# Altium PCB Audio-Switcher-v1.1.PcbDoc (part 2 of 2)
Units mil, origin at the board's own origin, x right, y up, seen from the top; angles counter-clockwise.
Board outline 6000 x 4000 mil, 2 copper layers (Top Layer, Bottom Layer); 150 components, 118 nets, 462 pads, 0 vias.
Unrouted connection lines stored in the file: 298.
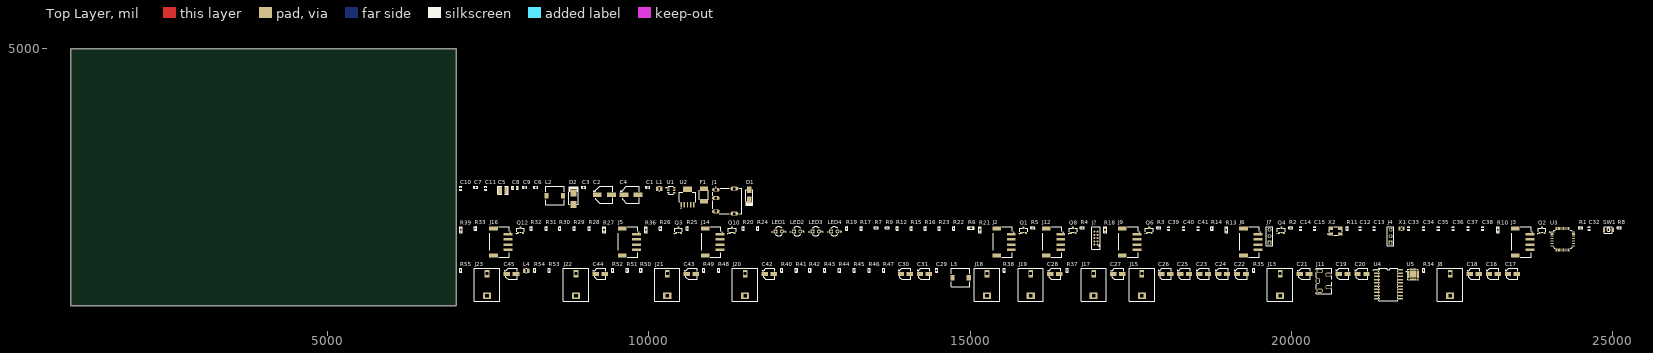
[diagram p0: Top Layer view]

## Part data (continued)
R8 R11 R14 R19 R24 R26 R28 R29 R30 R31 R33: library part RC0402FR-0710KL, "RES 10K OHM 1% 1/16W 0402", Case Code (Imperial)=0402, Case Code (Metric)=1005, LCSC Part Number=C60490, Manufacturer=Yageo, Max Operating Temperature=155°C, Max Power Dissipation=63mW, Min Operating Temperature=-55°C, Power Rating=62.5mW, Resistance=10kR, Resistance Tolerance=1%, Resistor Type="Thick Film", Supplier Part Number 1=603-RC0402FR-0710KL, Temperature Coefficient=100ppm/°C, Voltage Rating=50V, Case/Package=0402, Category="Chip SMD Resistors", ComponentLink1Description=https://datasheet.ciiva.com/7660/38568-7660787.pdf?src-supplier=Element14, ComponentLink1URL=https://datasheet.ciiva.com/7660/38568-7660787.pdf?src-supplier=Element14, ComponentLink2Description=https://datasheet.ciiva.com/7849/1686128-7849814.pdf?src-supplier=Element14, ComponentLink2URL=https://datasheet.ciiva.com/7849/1686128-7849814.pdf?src-supplier=Element14, ComponentLink3Description=https://datasheet.ciiva.com/7983/1018594-7983486.pdf?src-supplier=Element14, ComponentLink3URL=https://datasheet.ciiva.com/7983/1018594-7983486.pdf?src-supplier=Element14, ComponentLink4Description=https://datasheet.ciiva.com/22747/1018594-22747512.pdf?src-supplier=Element14, ComponentLink4URL=https://datasheet.ciiva.com/22747/1018594-22747512.pdf?src-supplier=Element14, ComponentLink5Description=https://datasheet.ciiva.com/12667/pyu-rc0402-51-rohs-l-6-r-12667067.pdf?src-supplier=Mouser, ComponentLink5URL=https://datasheet.ciiva.com/12667/pyu-rc0402-51-rohs-l-6-r-12667067.pdf?src-supplier=Mouser, ComponentLink6Description=https://datasheet.ciiva.com/7849/1784430-7849813.pdf?src-supplier=Element14, ComponentLink6URL=https://datasheet.ciiva.com/7849/1784430-7849813.pdf?src-supplier=Element14, ComponentLink7Description=https://datasheet.ciiva.com/7849/1784430-7849815.pdf?src-supplier=Element14, ComponentLink7URL=https://datasheet.ciiva.com/7849/1784430-7849815.pdf?src-supplier=Element14, Construction=Rectangular, Depth=0.5mm, Features="Moisture Resistant", Height=0.32mm, Item Type=Resistor, Lead Free="Lead Free", Lead Pitch=0.2mm, Length=1mm, Manufacturer Part Number=RC0402FR-0710KL, Military Standard=Not, Number of Pins=2, Number of Terminations=2, Packaging="Tape and Reel", Pricing 1="1=0.10000, 10=0.01400, 50=0.01400, 100=0.00500, 1000=0.00300, 10000=0.00200 (USD)", REACH SVHC="No SVHC", RoHS=Yes, RoHS Compliant=Yes, Series=RC, Stock 1=18648329, Supplier 1=Mouser, Termination=SMD/SMT, Tolerance=1%, Voltage Rating (DC)=50V, Width=0.5mm, Working Voltage=50V
R34 R35 R37 R38 R48 R49 R50 R51 R52 R53 R54 R55: library part RC0402FR-071KL, "RES 1K OHM 1% 1/16W 0402", Case Code (Imperial)=0402, Case Code (Metric)=1005, LCSC Part Number=C106235, Manufacturer=Yageo, Max Operating Temperature=155°C, Max Power Dissipation=63mW, Min Operating Temperature=-55°C, Power Rating=62.5mW, Resistance=1kR, Resistance Tolerance=1%, Resistor Type="Thick Film", Temperature Coefficient=100ppm/°C, Voltage Rating=50V, Case/Package=0402, Category="Chip SMD Resistors", ComponentLink1Description=https://datasheet.ciiva.com/11819/0900766b80c66297-11819477.pdf?src-supplier=RSComponents, ComponentLink1URL=https://datasheet.ciiva.com/11819/0900766b80c66297-11819477.pdf?src-supplier=RSComponents, ComponentLink2Description=https://datasheet.ciiva.com/7983/1018594-7983502.pdf?src-supplier=Element14, ComponentLink2URL=https://datasheet.ciiva.com/7983/1018594-7983502.pdf?src-supplier=Element14, ComponentLink3Description=https://datasheet.ciiva.com/22747/1018594-22747513.pdf?src-supplier=Element14, ComponentLink3URL=https://datasheet.ciiva.com/22747/1018594-22747513.pdf?src-supplier=Element14, ComponentLink4Description=https://datasheet.ciiva.com/12666/pyu-rc0402-51-rohs-l-6-r-12666741.pdf?src-supplier=Mouser, ComponentLink4URL=https://datasheet.ciiva.com/12666/pyu-rc0402-51-rohs-l-6-r-12666741.pdf?src-supplier=Mouser, ComponentLink5Description=https://datasheet.ciiva.com/7849/1018594-7849869.pdf?src-supplier=Element14, ComponentLink5URL=https://datasheet.ciiva.com/7849/1018594-7849869.pdf?src-supplier=Element14, ComponentLink6Description=https://datasheet.ciiva.com/7849/1018594-7849871.pdf?src-supplier=Element14, ComponentLink6URL=https://datasheet.ciiva.com/7849/1018594-7849871.pdf?src-supplier=Element14, ComponentLink7Description=https://datasheet.ciiva.com/17063/pyu-rc0402-51-rohs-l-6-r-17063193.pdf?src-supplier=Future+Electronics, ComponentLink7URL=https://datasheet.ciiva.com/17063/pyu-rc0402-51-rohs-l-6-r-17063193.pdf?src-supplier=Future+Electronics, Construction=Rectangular, Depth=0.5mm, Features="Moisture Resistant", Height=0.32mm, Item Type=Resistor, Lead Free="Lead Free", Length=1mm, Manufacturer Part Number=RC0402FR-071KL, Military Standard=Not, Number of Pins=2, Number of Terminations=2, Packaging="Tape and Reel", Pricing 1="10000=0.00085, 20000=0.00087, 40000=0.00084, 60000=0.00083, 80000=0.00079, 100000=0.00078, 1000000=0.00076 (USD)", Reach SVHC Compliant=Yes, RoHS=Yes, RoHS Compliant=Yes, Series=RC, Size Code=0402, Stock 1=13030000, Supplier 1=Avnet, Supplier Part Number 1=RC0402FR-071KL, Technology="THICK FILM", Termination=SMD/SMT, Tolerance=1%, Voltage Rating (DC)=50V, Width=0.5mm
R40 R41 R42 R43 R44 R45 R46 R47: library part RC0402FR-07100KL, "RES 100K OHM 1% 1/16W 0402", Case Code (Imperial)=0402, Case Code (Metric)=1005, LCSC Part Number=C60491, Manufacturer=Yageo, Max Operating Temperature=155°C, Max Power Dissipation=63mW, Min Operating Temperature=-55°C, Package Quantity=1, Resistance=100kR, Resistance Tolerance=1%, Resistor Type="Thick Film", Supplier Part Number 1=603-RC0402FR-07100KL, Temperature Coefficient=100ppm/°C, Voltage Rating=50V, Case/Package=0402, Category="Chip SMD Resistors", ComponentLink1Description=https://datasheet.ciiva.com/11819/0900766b80c66297-11819452.pdf?src-supplier=RSComponents, ComponentLink1URL=https://datasheet.ciiva.com/11819/0900766b80c66297-11819452.pdf?src-supplier=RSComponents, ComponentLink2Description=https://datasheet.ciiva.com/22747/1018594-22747509.pdf?src-supplier=Element14, ComponentLink2URL=https://datasheet.ciiva.com/22747/1018594-22747509.pdf?src-supplier=Element14, ComponentLink3Description=https://datasheet.ciiva.com/2453/pyu-r-int-thick-7-2453362.pdf?src-supplier=Digi-Key, ComponentLink3URL=https://datasheet.ciiva.com/2453/pyu-r-int-thick-7-2453362.pdf?src-supplier=Digi-Key, ComponentLink4Description=https://datasheet.ciiva.com/2453/pyu-r-int-thick-7-2453363.pdf?src-supplier=Digi-Key, ComponentLink4URL=https://datasheet.ciiva.com/2453/pyu-r-int-thick-7-2453363.pdf?src-supplier=Digi-Key, ComponentLink5Description=https://datasheet.ciiva.com/2453/pyu-r-int-thick-7-2453361.pdf?src-supplier=Digi-Key, ComponentLink5URL=https://datasheet.ciiva.com/2453/pyu-r-int-thick-7-2453361.pdf?src-supplier=Digi-Key, ComponentLink6Description=https://datasheet.ciiva.com/12667/pyu-rc0402-51-rohs-l-6-r-12667930.pdf?src-supplier=Mouser, ComponentLink6URL=https://datasheet.ciiva.com/12667/pyu-rc0402-51-rohs-l-6-r-12667930.pdf?src-supplier=Mouser, ComponentLink7Description=https://datasheet.ciiva.com/15189/getdatasheetpartid-323696-15189334.pdf?src-supplier=Verical, ComponentLink7URL=https://datasheet.ciiva.com/15189/getdatasheetpartid-323696-15189334.pdf?src-supplier=Verical, Construction=Rectangular, Depth=0.5mm, Features="Moisture Resistant", Height=0.016inch, Item Type=Resistor, Lead Free="Lead Free", Length=0.039inch, Manufacturer Part Number=RC0402FR-07100KL, Military Standard=Not, Number of Terminations=2, Packaging="Tape and Reel", Power Rating=63mW, Pricing 1="1=0.10000, 10=0.01200, 50=0.01200, 100=0.00500, 1000=0.00300, 2500=0.00200, 10000=0.00100 (USD)", REACH SVHC="No SVHC", RoHS=Yes, RoHS Compliant=Yes, Series=RC, Stock 1=7759549, Supplier 1=Mouser, Technology="THICK FILM", Termination=SMD/SMT, Tolerance=1%, Width=0.02inch, Working Voltage=50V
SW1: "SWITCH TACTILE SPST-NO 0.05A 12V", Contact Current Rating=50mA, Contact Resistance=100mR, Insulation Resistance=100MR, LCSC Part Number=C231329, Manufacturer=Omron, Max Operating Temperature=70°C, Max Voltage Rating (DC)=12V, Min Operating Temperature=-25°C, Operating Force=1.5N, Package Quantity=1, Ratings="Dust Proof,IP40", Supplier Part Number 1=SW1020DKR-ND, Actuator Length=0.4mm, Actuator Type=Standard, ComponentLink1Description=http://www.farnell.com/datasheets/60838.pdf?src-supplier=Farnell, ComponentLink1URL=http://www.farnell.com/datasheets/60838.pdf?src-supplier=Farnell, ComponentLink2Description=http://www.farnell.com/datasheets/60838.pdf?src-supplier=Element14, ComponentLink2URL=http://www.farnell.com/datasheets/60838.pdf?src-supplier=Element14, ComponentLink3Description=https://omronfs.omron.com/en_US/ecb/products/pdf/en-b3u.pdf?src-supplier=Digi-Key, ComponentLink3URL=https://omronfs.omron.com/en_US/ecb/products/pdf/en-b3u.pdf?src-supplier=Digi-Key, ComponentLink4Description=http://www.omron.com/ecb/products/pdf/en-b3u.pdf?src-supplier=Digi-Key, ComponentLink4URL=http://www.omron.com/ecb/products/pdf/en-b3u.pdf?src-supplier=Digi-Key, ComponentLink5Description=https://www.distrelec.biz/Web/Downloads/he/et/B3U_eng_datasheet.pdf?mime=application%2Fpdf&src-supplier=Distrelec, ComponentLink5URL=https://www.distrelec.biz/Web/Downloads/he/et/B3U_eng_datasheet.pdf?mime=application%2Fpdf&src-supplier=Distrelec, ComponentLink6Description=http://www.onlinecomponents.com/productFiles/mf-OM/en-b3u.pdf?src-supplier=Onlinecomponents.com, ComponentLink6URL=http://www.onlinecomponents.com/productFiles/mf-OM/en-b3u.pdf?src-supplier=Onlinecomponents.com, ComponentLink7Description=https://www.verical.com/server-webapp/html/getDatasheet?partID=552554&src-supplier=Verical, ComponentLink7URL=https://www.verical.com/server-webapp/html/getDatasheet?partID=552554&src-supplier=Verical, ComponentLink8Description=http://www.farnell.com/datasheets/1685550.pdf?src-supplier=Element14, ComponentLink8URL=http://www.farnell.com/datasheets/1685550.pdf?src-supplier=Element14, ComponentLink9Description=http://www.farnell.com/datasheets/2610940.pdf?src-supplier=Farnell, ComponentLink9URL=http://www.farnell.com/datasheets/2610940.pdf?src-supplier=Farnell, ComponentLink10Description=https://www.alliedelec.com/m/d/4c8a9ef82804fc3c241a13c1e298fd73.pdf?src-supplier=Allied+Electronics, ComponentLink10URL=https://www.alliedelec.com/m/d/4c8a9ef82804fc3c241a13c1e298fd73.pdf?src-supplier=Allied+Electronics, Contact Material=Silver, Current Rating=50mA, Depth=2.5mm, Electrical Life=200000Cycles, Height=1.2mm, Illumination Type=Non-Illuminated,Illuminated, Item Type=Switch, Lead Free="Lead Free", Length=4mm, Manufacturer Part Number=B3U-1000P, Max Current Rating=50mA, Mechanical Life=200000Cycles, Mount="Surface Mount", Orientation=Straight, Packaging="Tape and Reel", Pricing 1="1=1, 10=0.961, 25=0.9064, 50=0.7976, 100=0.7251, 250=0.68888, 500=0.67074, 1000=0.52571 (USD)", REACH SVHC=Unknown, Stock 1=116454, Supplier 1=Digi-Key, Switch Function=Off-Mom, Switch Travel=0.15mm, Termination=SMD/SMT, Throw Configuration=SPST, Voltage Rating (DC)=12V, Weight=0.000776oz, Width=3mm
U1: "IC REG BUCK 5V 2A TSOT26", LCSC Part Number=C2071056, Manufacturer=Diodes, Supplier Part Number 1=AP63205WU-7DICT-ND, Category="Voltage Regulators - Switching", Item Type=IC, Manufacturer Part Number=AP63205WU-7, Pricing 1="1=0.88, 10=0.776, 25=0.7292, 100=0.5952, 250=0.55284, 500=0.4705, 1000=0.3764 (USD)", RoHS=Yes, Stock 1=88525, Supplier 1=Digi-Key
U2: "IC REG LINEAR 3.3V 1A SOT223-6", LCSC Part Number=C485803, Manufacturer="Texas Instruments", Supplier Part Number=595-TPS79633DCQR, Category="Voltage Regulators - Linear", ComponentLink1Description=https://datasheet.ciiva.com/2045/tps79601-2045264.pdf?src-supplier=Digi-Key, ComponentLink1URL=https://datasheet.ciiva.com/2045/tps79601-2045264.pdf?src-supplier=Digi-Key, ComponentLink2Description=https://datasheet.ciiva.com/22704/1846966-22704703.pdf?src-supplier=Element14, ComponentLink2URL=https://datasheet.ciiva.com/22704/1846966-22704703.pdf?src-supplier=Element14, ComponentLink3Description=https://datasheet.ciiva.com/41462/001015136-da-01-en-ic-reg-ldo-3-3v-1-tps79633dcqr-sot-6-tid-41462982.pdf?src-supplier=Conrad, ComponentLink3URL=https://datasheet.ciiva.com/41462/001015136-da-01-en-ic-reg-ldo-3-3v-1-tps79633dcqr-sot-6-tid-41462982.pdf?src-supplier=Conrad, Item Type=IC, Length=6.5mm, Manufacturer Part Number=TPS79633DCQR, Pricing="1=3.24, 10=2.75, 50=2.75, 100=2.39, 1000=1.72, 10000=1.56 (USD)", RoHS=Yes, Stock=3089, Supplier=Mouser, Thickness=1.6mm, Width=3.5mm
U3: "ARM Cortex-M3 STM32 F1 Microcontroller 32-Bit 72MHz 64kB FLASH LQFP48 STM32F103C8T6", Case/Package=LQFP, Clock Frequency=72MHz, Manufacturer=STMicroelectronics, Max Operating Temperature=85°C, Max Supply Voltage=3.6V, Min Operating Temperature=-40°C, Min Supply Voltage=2V, Nominal Supply Current=1.7uA, Package Quantity=1500, Supplier Part Number=511-STM32F103C8T6, Category=Microcontrollers, ComponentLink1Description=https://datasheet.ciiva.com/8054/1730126-8054942.pdf?src-supplier=Element14, ComponentLink1URL=https://datasheet.ciiva.com/8054/1730126-8054942.pdf?src-supplier=Element14, ComponentLink2Description=https://datasheet.ciiva.com/48687/001075658-da-01-en-mcu-64kb-mem-stm32f103c8t6-lqfp-48-stm-48687589.pdf?src-supplier=Conrad, ComponentLink2URL=https://datasheet.ciiva.com/48687/001075658-da-01-en-mcu-64kb-mem-stm32f103c8t6-lqfp-48-stm-48687589.pdf?src-supplier=Conrad, Core Architecture=ARM, Data Bus Width=32b, Height=1.4mm, Interface=I2C,SPI,USB,CAN,USART, Lead Free="Lead Free", Length=7mm, Manufacturer Part Number=STM32F103C8T6, Memory Format=FLASH, Memory Size=64KB, Number of A/D Converters=2NUMBER, Number of ADC Channels=10, Number of Channels=10NUMBER, Number of I/Os=37, Number of Timers/Counters=3, Packaging=Tray, Pins=48, Pricing="1=6.11, 10=5.53, 50=5.27, 100=4.58, 1000=3.47, 10000=3.33 (USD)", RAM Size=20KB, RoHS=Yes, RoHS Compliant=Yes, Series=STM32F103C8, Stock=27404, Supplier=Mouser, Weight=0.006349oz, Width=7mm
U4: "SOP-20-300mil Audio Interface ICs ROHS", LCSC Part Number=C99213, Manufacturer=PTC, Package=SOP-20-300mil, ComponentLink1Description=LCSC, ComponentLink1URL=https://www.lcsc.com/product-detail/Audio-Interface-ICs_PTC-Princeton-Tech-PT2258-S_C99213.html, Item Type=IC, Manufacturer Part Number=PT2258-S
U5: "IC MUX 16:2 8OHM 28TQFN", LCSC Part Number=C2673449, Manufacturer=Maxim, Max Operating Temperature=85°C, Min Operating Temperature=-40°C, Package Quantity=2500, -3db Bandwidth=60MHz, ComponentLink1Description=http://www.mouser.com/ds/2/256/MAX14661-263830.pdf?src-supplier=Mouser, ComponentLink1URL=http://www.mouser.com/ds/2/256/MAX14661-263830.pdf?src-supplier=Mouser, ComponentLink2Description=https://datasheets.maximintegrated.com/en/ds/MAX14661.pdf?src-supplier=Digikey, ComponentLink2URL=https://datasheets.maximintegrated.com/en/ds/MAX14661.pdf?src-supplier=Digikey, ComponentLink3Description=http://datasheets.maximintegrated.com/en/ds/MAX14661.pdf?src-supplier=Digikey, ComponentLink3URL=http://datasheets.maximintegrated.com/en/ds/MAX14661.pdf?src-supplier=Digikey, Item Type=IC, Manufacturer Part Number=MAX14661ETI+T, Number of Circuits=1, Packaging="Tape and Reel", Pins=28, Pricing="1=11.47, 10=8.67, 50=7.73, 100=6.68, 1000=5.63, 10000=5.62 (USD)", RoHS=Yes, RoHS Compliant=Yes, Series=-, Stock=4736, Supplier=Mouser
X1: library part CM8V-T1A-32.768KHZ-6PF-20PPM-TA-QC, "Crystal 32.768KHZ 6.0PF SMD", Manufacturer="Micro Crystal", Supplier Part Number 1=2195-CM8V-T1A-32.768KHZ-6PF-20PPM-TA-QCCT-ND, Manufacturer Part Number=CM8V-T1A-32.768KHZ-6PF-20PPM-TA-QC, Pricing 1="1=0.68000, 10=0.56400, 50=0.50740, 100=0.45100, 500=0.42844 (USD)", RoHS=No, Stock 1=21000, Supplier 1=Digi-Key
X2: library part 5TJ480000XYLBC, "8MHz 18pF ±10ppm SMD5032-4P Crystals ROHS", LCSC Part Number=C2149247, Manufacturer=JYJE, Package=SMD5032-4P, ComponentLink1Description=LCSC, ComponentLink1URL=https://www.lcsc.com/product-detail/Crystals_JYJE-5TJ480000XYLBC_C2149247.html, Item Type=Crystal, Manufacturer Part Number=5TJ480000XYLBC

## Nets (pads, with @x,y where several pads share a name; then routed paths per layer and width w, separated by ;. In a path a pad name is that pad's centre, name@x,y a point inside that pad or via, vN(x,y) a via of type N, cw(c..) or ccw(c..) an arc to the next point about the centre after c; other vN are vias at no path point)
3V3: C6.2 C33.2 C34.2 C35.2 C36.2 C37.2 C38.2 C39.2 C40.2 C41.2 J2.1 J3.1 J4.1 J5.1 J6.1 J7.1 J9.1 J12.1 J14.1 J16.1 J?.1 L1.2 R8.2 R16.1 R17.1 R19.1 R22.1 R23.1 R24.1 R26.1 R28.1 R29.1 R30.1 R31.1 R33.1 U3.1 U3.9 U3.24 U3.36 U3.48 U5.22 U5.26
5V: C7.2 C8.2 C11.2 L2.2 L3.2 U1.1 U2.1 U2.2
AGND: C22.2 C29.1 C30.2 C31.2 J8.1 J11.2 J13.1 J15.1 J17.1 J18.1 J19.1 J20.1 J21.1 J22.1 J23.1 L4.1 R40.1 R41.1 R42.1 R43.1 R44.1 R45.1 R46.1 R47.1 U4.14
BOOT_0: R11.2 U3.44
BOOT_1: R14.2 U3.20
COMB_LIN: R49.2 R51.2 U5.10
COMB_RIN: R52.2 R54.2 U5.13
DC_IN: C2.1 C3.2 C4.1 C5.2 D2.2 F1.2 U1.2 U1.3
FR_LO: R34.1 U5.2
FR_RO: R35.1 U5.3
FRONT_SEL: R7.2 U3.40
GND: C2.2 C3.1 C4.2 C5.1 C6.1 C7.1 C8.1 C9.1 C10.1 C11.1 C12.1 C13.1 C14.1 C15.1 C32.1 C33.1 C34.1 C35.1 C36.1 C37.1 C38.1 C39.1 C40.1 C41.1 D2.1 J1.2 J1.S1 J1.S2 J2.4 J3.4 J4.3 J5.4 J6.4 J7.3 J9.4 J12.4 J14.4 J16.4 J?.2 J?.3 J?.5 L4.2 LED1.1 LED2.1 LED3.1 LED4.1 Q1.2 Q2.2 Q3.2 Q4.2 Q6.2 Q8.2 Q10.2 Q12.2 SW1.2 U1.4 U2.3 U2.6 U3.8 U3.23 U3.35 U3.47 U4.4 U4.5 U5.1 U5.11 U5.23 U5.25 U5.28 U5.29 X2.2 X2.4
HP_LIN: C19.2 J11.6 R41.2
HP_LO: C20.2 R45.2 R49.1
HP_RIN: C16.2 J11.3 R40.2
HP_RO: C17.2 R44.2 R52.1
NetC1_1: C1.1 L2.1 U1.5
NetC1_2: C1.2 U1.6
NetC9_2: C9.2 L1.1 U2.4
NetC10_2: C10.2 U2.5
NetC12_2: C12.2 U3.4 X1.1
NetC13_2: C13.2 U3.3 X1.2
NetC14_2: C14.2 U3.5 X2.1
NetC15_2: C15.2 U3.6 X2.3
NetC16_1: C16.1 U4.1
NetC17_1: C17.1 U4.20
NetC18_1: C18.1 J8.2
NetC18_2: C18.2 R34.2
NetC19_1: C19.1 U4.2
NetC20_1: C20.1 U4.19
NetC21_1: C21.1 J13.2
NetC21_2: C21.2 R35.2
NetC22_1: C22.1 U4.15
NetC23_1: C23.1 U4.9
NetC24_1: C24.1 U4.12
NetC25_1: C25.1 U4.11
NetC26_1: C26.1 U4.10
NetC27_1: C27.1 J17.2
NetC27_2: C27.2 R37.2
NetC28_1: C28.1 J19.2
NetC28_2: C28.2 R38.2
NetC42_1: C42.1 J20.2
NetC42_2: C42.2 R48.2
NetC43_1: C43.1 J21.2
NetC43_2: C43.2 R50.2
NetC44_1: C44.1 J22.2
NetC44_2: C44.2 R53.2
NetC45_1: C45.1 J23.2
NetC45_2: C45.2 R55.2
NetD1_1: D1.1 F1.1
NetD1_2: D1.2 J1.1
NetJ2_2: J2.2 R6.2
NetJ3_2: J3.2 R10.2
NetJ4_2: J4.2 R11.1
NetJ5_2: J5.2 R27.2
NetJ6_2: J6.2 R13.2
NetJ7_2: J7.2 R14.1
NetJ9_2: J9.2 R18.2
NetJ12_2: J12.2 R21.2
NetJ14_2: J14.2 R36.2
NetJ16_2: J16.2 R39.2
NetLED1_2: LED1.2 R7.1
NetLED2_2: LED2.2 R9.1
NetLED3_2: LED3.2 R12.1
NetLED4_2: LED4.2 R15.1
NetQ1_1: Q1.1 R5.2
NetQ1_3: Q1.3 R6.1
NetQ2_1: Q2.1 R1.2
NetQ2_3: Q2.3 R10.1
NetQ3_1: Q3.1 R25.2
NetQ3_3: Q3.3 R27.1
NetQ4_1: Q4.1 R2.2
NetQ4_3: Q4.3 R13.1
NetQ6_1: Q6.1 R3.2
NetQ6_3: Q6.3 R18.1
NetQ8_1: Q8.1 R4.2
NetQ8_3: Q8.3 R21.1
NetQ10_1: Q10.1 R20.2
NetQ10_3: Q10.3 R36.1
NetQ12_1: Q12.1 R32.2
NetQ12_3: Q12.3 R39.1
OUT_LED1: R1.1 U3.30
OUT_LED2: R2.1 U3.31
OUT_LED3: R3.1 U3.32
OUT_LED4: R4.1 U3.33
OUT_LED5: R5.1 U3.25
OUT_LED6: R25.1 U3.26
OUT_LED_VD: R32.1 U3.28
OUT_LED_VU: R20.1 U3.27
OUT_SW1: J3.3 R19.2 U3.11
OUT_SW2: J6.3 R24.2 U3.12
OUT_SW3: J9.3 R26.2 U3.13
OUT_SW4: J12.3 R28.2 U3.14
OUT_SW5: J2.3 R29.2 U3.15
OUT_SW6: J5.3 R30.2 U3.16
R1_LO: R37.1 U5.5
R1_RO: R38.1 U5.6
R2_LO: R48.1 U5.8
R2_RO: R50.1 U5.9
RCA_LIN: C23.2 J15.2 R42.2
RCA_LO: C24.2 R46.2 R51.1
RCA_RIN: C26.2 J18.2 R43.2
RCA_RO: C25.2 R47.2 R54.1
REAR2_SEL: R12.2 U3.45
REAR_SEL: R9.2 U3.41
RST: C32.2 J?.10 R8.1 SW1.1 U3.7
SCL1: R22.2 U3.42 U4.6
SCL2: R16.2 U3.21 U5.24
SDA1: R23.2 U3.43 U4.7
SDA2: R17.2 U3.22 U5.27
SUB_LO: R53.1 U5.21
SUB_RO: R55.1 U5.20
SUB_SEL: R15.2 U3.46
SWDCLK: J?.7 U3.37
SWDIO: J?.6 U3.34
VCC1: C29.2 C30.1 C31.1 L3.1 U4.16 U4.17
VOLDWN_SW: J16.3 R33.2 U3.29
VOLUP_SW: J14.3 R31.2 U3.17
pads on no net: J1. J1.3 J2.P1 J2.P2 J3.P1 J3.P2 J5.P1 J5.P2 J6.P1 J6.P2 J9.P1 J9.P2 J11.4 J11.5 J11.S7 J12.P1 J12.P2 J14.P1 J14.P2 J16.P1 J16.P2 J?.4 J?.8 J?.9 J?.MP1 J?.MP2 J?.MP3 U3.2 U3.10 U3.18 U3.19 U3.38 U3.39 U4.3 U4.8 U4.13 U4.18 U5.4 U5.7 U5.12 U5.14 U5.15 U5.16 U5.17 U5.18 U5.19